# Allegro board TB67S109_V10_220218.brd
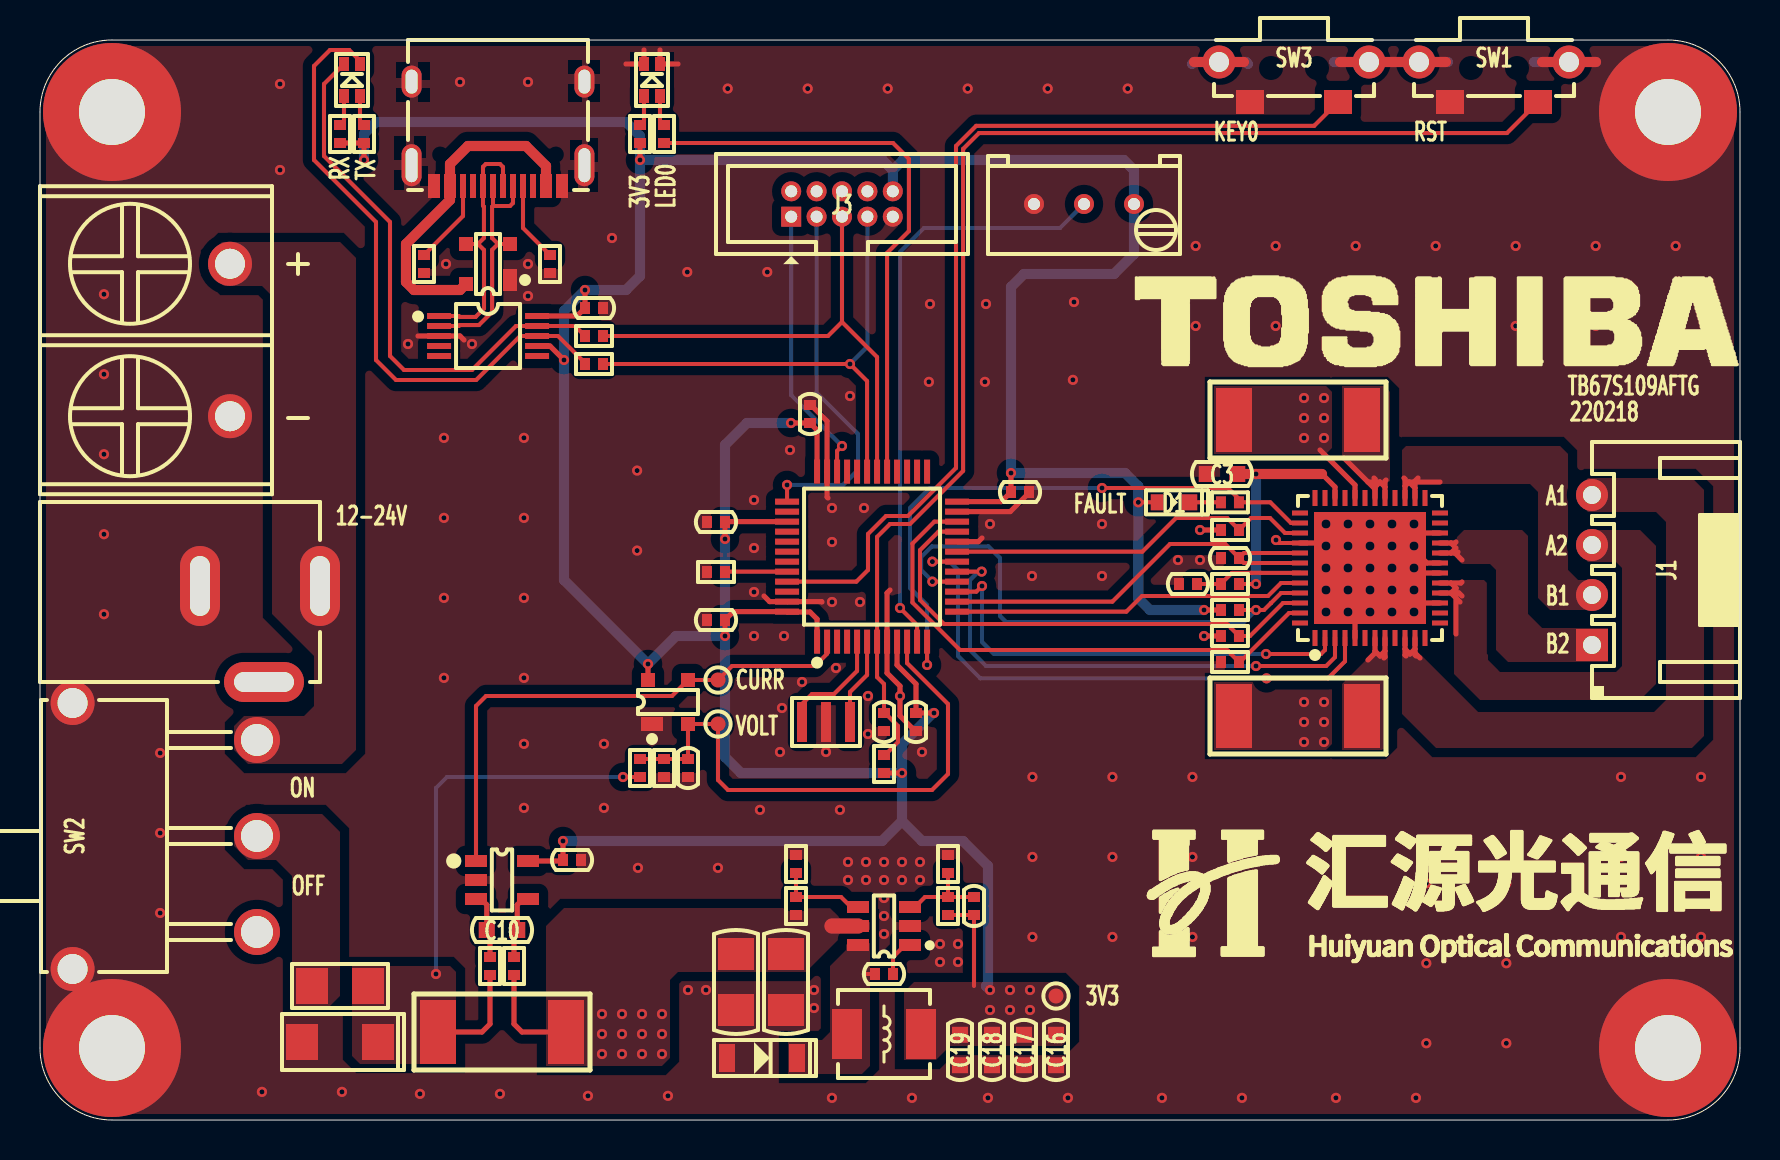
[diagram p0: board, top side]
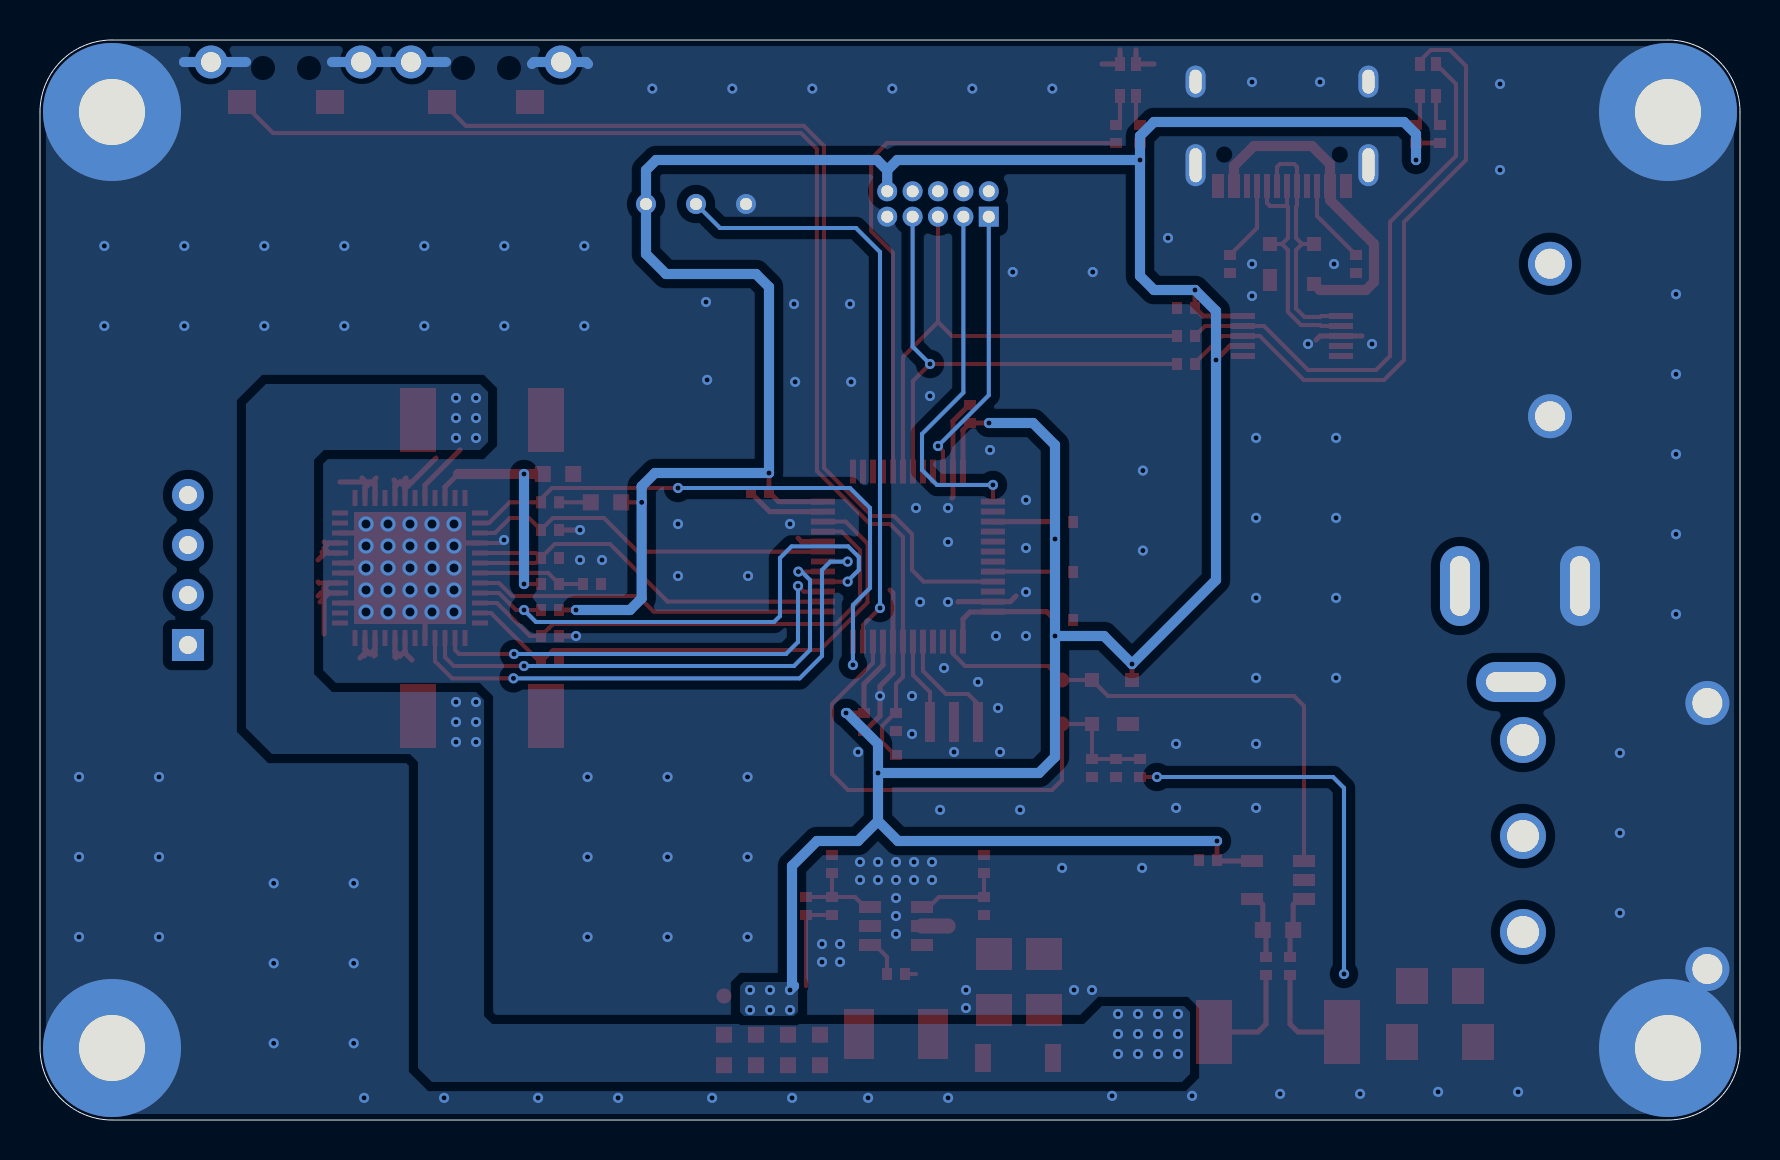
[diagram p1: board, bottom side, seen from below]

Outline 85 x 54 mm; copper layers: TOP, BOTTOM. Coordinates in mm from the lower left corner of the outline.
Outline path: 0,50.4 arc(1.05,52.95) 3.6,54 81.4,54 arc(83.95,52.95) 85,50.4 85,3.6 arc(83.95,1.05) 81.4,0 3.6,0 arc(1.05,1.05) 0,3.6 0,50.4

## Design rules (mm)
constraint set DEFAULT: min track width 0.203, pair gap 0.203
net group USB_D: nets USB_DM USB_DP

## Placement (name value [footprint] x y rotation side)
C1  1nF_50V  [C0402]  59.5 28.1 0 top
C2  1nF_50V  [C0402]  57.4 26.8 180 top
C3  10uF_10V  [C0603]  59.1 32.3 0 top
C4  100nF_50V  [C0402]  49 31.4 0 top
C5  100nF_50V  [C0402]  33.8 29.9 180 top
C6  100nF_50V  [C0402]  38.5 35.3 90 top
C7  100nF_50V  [C0402]  33.8 25 180 top
C8  100nF_50V  [C0402]  42.2 19.9 270 top
C9  100nF_50V  [C0402]  26.6 13 180 top
C10  10uF_10V  [C0603]  23.1 9.5 0 top
C11  100nF_50V  [C0402]  32.4 17.6 270 top
C12  100nF_50V  [C0402]  42.2 7.3 180 top
C13  10uF_50V  [C1206]  37.3 6.9 270 top
C14  10uF_50V  [C1206]  34.8 6.9 270 top
C15  30pF_50V  [C0402]  46.7 10.7 270 top
C16  10uF_10V  [C0603]  50.8 3.5 270 top
C17  10uF_10V  [C0603]  49.2 3.5 270 top
C18  10uF_10V  [C0603]  47.6 3.5 270 top
C19  10uF_10V  [C0603]  46 3.5 270 top
C20  100nF_50V  [C0402]  27.7 40.6 180 top
C21  100nF_50V  [C0402]  43.8 19.9 270 top
D1  LED_GREEN  [LED0603]  56.7 30.88 0 top
D2  -  [XL-2012SURUGC]  30.6 52 270 top
D3  SS56F  [SMAF]  15 3.9 0 top
D4  -  [XL-2012SURUGC]  15.6 52 270 top
D5  MBR140  [SOD123]  36.1 3.1 180 top
DC1  -  [DC005]  8 26.7 0 top
F1  0469005.WR  [FUSE1206]  15 6.7 0 top
J1  -  [HX25035-4WA]  77.6 27.5 90 top
J2  KF7.62-2P  [KF7R62-2P]  9.5 39 90 top
J3  -  [DC3-10P-Z]  40.1 45.8 180 top
L1  FXL0420-100-M  [L0420]  42.2 4.3 0 top
MH1  HOLD_M3/NI  [HOLD6R90X3R40]  3.6 3.6 0 top
MH2  HOLD_M3/NI  [HOLD6R90X3R40]  81.4 3.6 0 top
MH3  HOLD_M3/NI  [HOLD6R90X3R40]  81.4 50.4 0 top
MH4  HOLD_M3/NI  [HOLD6R90X3R40]  3.6 50.4 0 top
NOREF  -  []  0 0 0 top
NOREF#2  -  []  0 0 90 top
NOREF#3  -  []  0 0 0 top
NOREF#4  -  []  0 0 0 top
NOREF#5  -  []  0 0 90 top
NOREF#6  -  []  0 0 90 top
R1  10K  [R0402]  33.8 27.4 0 top
R2  10K  [R0402]  59.5 29.5 0 top
R3  10K  [R0402]  59.5 24.2 0 top
R4  10K  [R0402]  59.5 22.9 0 top
R5  10K  [R0402]  59.5 25.5 180 top
R6  10K  [R0402]  59.5 30.88 0 top
R7  1K  [R0402]  59.5 26.8 0 top
R8  0R25  [R2512]  62.9 20.2 0 top
R9  0R25  [R2512]  62.9 35 0 top
R10  10K  [R0402]  42.2 17.8 90 top
R11  4.7K  [R0402]  31.2 49.3 90 top
R12  10R  [R0402]  22.5 7.7 270 top
R13  10R  [R0402]  23.7 7.7 270 top
R14  4.7K  [R0402]  30 49.3 90 top
R15  0R5  [R2512]  23.1 4.4 180 top
R16  100K  [R0402]  30 17.6 270 top
R17  10K  [R0402]  31.2 17.6 90 top
R18  10K  [R0402]  37.8 12.8 90 top
R19  100K  [R0402]  37.8 10.7 90 top
R20  30K  [R0402]  45.4 12.8 270 top
R21  4.7K  [R0402]  16.2 49.3 270 top
R22  4.7K  [R0402]  15 49.3 270 top
R23  4.7K  [R0402]  25.5 42.8 90 top
R24  100K  [R0402]  45.4 10.7 270 top
R25  1K  [R0402]  27.7 39.2 180 top
R26  4.7K  [R0402]  19.2 42.8 270 top
R27  1K  [R0402]  27.7 37.8 180 top
RP1  3296W-1-503  [3296W]  52.2 45.8 0 top
SW1  -  [K2-1112SW-A4SW-04]  72.7 52.6 0 top
SW2  -  [SS-12D11G3R]  3.2 14.2 90 top
SW3  -  [K2-1112SW-A4SW-04]  62.7 52.6 0 top
TP1  TP/NI  [TP-0R75]  33.9 22 0 top
TP2  TP/NI  [TP-0R75]  33.9 19.8 0 top
TP3  TP/NI  [TP-0R75]  50.8 6.2 0 top
U1  STM32F103CBT6  [LQFP48-7X7X0R5]  41.6 28.17 0 top
U2  TB67S109AFTG  [QFN48-7X7X0R5-5R6X5R6]  66.5 27.6 0 top
U3  INA193AIDBV  [SOT23-5]  23.1 12 270 top
U4  PRTR5V0U2X  [SOT143B]  31.4 20.9 0 top
U5  BL9342  [SOT23-6]  42.2 9.7 90 top
U6  CH340E  [MSOP10]  22.4 39.2 270 top
U7  PRTR5V0U2X  [SOT143B]  22.4 42.8 90 top
USB1  -  [TYPE-C-31-M-12]  22.9 46.7 180 top
X1  CSTCE8M00G15C99-R0  [X-3P-3R2X1R3-SMD]  39.3 19.9 0 top

## Library data of the parts
C1-C7 C9 C20 C21 = CAP NP_2
C8 = CAP NP
C10-C19 = CAP NP_3
D1 = LED_4
D2 D4 = XL-2012SURUGC
D3 = DIODE13_9
D5 = BZX84C15/SOT_2
DC1 = DC005
F1 = FUSE
J1 = CONN RCPT 4
J2 = CONN RCPT 2
J3 = DC3-10P-Z-L
L1 = INDUCTOR_0
MH1-MH4 = Hold_1
R1-R27 = R_Generic
RP1 = 3296W-1-503
SW1 SW3 = SWITCH-SPST-4P
SW2 = SWITCH_3P
TP1-TP3 = TestPoint
U1 = STM32F103C8T6
U2 = TB67S109AFTG
U3 = 74AHC1G08_1
U4 U7 = PRTR5V0U2X
U5 = BL9342
U6 = CH340E
USB1 = TYPE-C_0
X1 = XTAL_5032_0

## Footprints (pads in the part's own frame, mm; a bottom-side part is the same pattern mirrored in y, then rotated)
3296W
  round 1 hole 0.6: 1(-2.5,0) 2(0,0) 3(2.5,0)
C0402
  rect 0.5x0.6 smd: 1(-0.45,0) 2(0.45,0)
C0603
  rect 0.8x0.8 smd: 1(-0.762,0) 2(0.762,0)
C1206
  rect 1.6x1.8 smd: 1(-1.4,0) 2(1.4,0)
DC3-10P-Z
  rect 1x1 hole 0.6: 1(2.54,0.635)
  round 1 hole 0.6: 2(2.54,-0.635) 3(1.27,0.635) 4(1.27,-0.635) 5(0,0.635) 6(0,-0.635) 7(-1.27,0.635) 8(-1.27,-0.635) 9(-2.54,0.635) 10(-2.54,-0.635)
DC005
  oval 2x4 hole 1x3: 1(6,0) 2(0,0)
  oval 4x2 hole 3x1: 3(3.2,-4.8)
FUSE1206
  rect 1.6x1.8 smd: 1(-1.4,0) 2(1.4,0)
HOLD6R90X3R40
  round 6.9 hole 3.3: 1(0,0)
HX25035-4WA
  rect 1.6x1.6 hole 0.9: 1(-3.75,0)
  round 1.6 hole 0.9: 2(-1.25,0) 3(1.25,0) 4(3.75,0)
K2-1112SW-A4SW-04
  round 1.65 hole 1: 1(-3.75,0.3) 4(3.75,0.3)
  rect 1.4x1.2 smd: 2(-2.2,-1.7) 3(2.2,-1.7)
KF7R62-2P
  round 2.2 hole 1.5: 1(-3.81,0) 2(3.81,0)
L0420
  rect 1.5x2.5 smd: 1(-1.85,0) 2(1.85,0)
LED0603
  rect 0.8x0.8 smd: 1(-0.762,0) 2(0.762,0)
LQFP48-7X7X0R5
  rect 0.3x1.2 smd: 1(-2.75,-4.25) 2(-2.25,-4.25) 3(-1.75,-4.25) 4(-1.25,-4.25) 5(-0.75,-4.25) 6(-0.25,-4.25) 7(0.25,-4.25) 8(0.75,-4.25) 9(1.25,-4.25) 10(1.75,-4.25) 11(2.25,-4.25) 12(2.75,-4.25) 25(2.75,4.25) 26(2.25,4.25) 27(1.75,4.25) 28(1.25,4.25) 29(0.75,4.25) 30(0.25,4.25) 31(-0.25,4.25) 32(-0.75,4.25) 33(-1.25,4.25) 34(-1.75,4.25) 35(-2.25,4.25) 36(-2.75,4.25)
  rect 1.2x0.3 smd: 13(4.25,-2.75) 14(4.25,-2.25) 15(4.25,-1.75) 16(4.25,-1.25) 17(4.25,-0.75) 18(4.25,-0.25) 19(4.25,0.25) 20(4.25,0.75) 21(4.25,1.25) 22(4.25,1.75) 23(4.25,2.25) 24(4.25,2.75) 37(-4.25,2.75) 38(-4.25,2.25) 39(-4.25,1.75) 40(-4.25,1.25) 41(-4.25,0.75) 42(-4.25,0.25) 43(-4.25,-0.25) 44(-4.25,-0.75) 45(-4.25,-1.25) 46(-4.25,-1.75) 47(-4.25,-2.25) 48(-4.25,-2.75)
MSOP10
  rect 0.3x1.2 smd: 1(-1,-2.45) 2(-0.5,-2.45) 3(0,-2.45) 4(0.5,-2.45) 5(1,-2.45) 6(1,2.45) 7(0.5,2.45) 8(0,2.45) 9(-0.5,2.45) 10(-1,2.45)
QFN48-7X7X0R5-5R6X5R6
  rect 0.25x0.8 smd: 1(-2.75,-3.5) 2(-2.25,-3.5) 3(-1.75,-3.5) 4(-1.25,-3.5) 5(-0.75,-3.5) 6(-0.25,-3.5) 7(0.25,-3.5) 8(0.75,-3.5) 9(1.25,-3.5) 10(1.75,-3.5) 11(2.25,-3.5) 12(2.75,-3.5) 25(2.75,3.5) 26(2.25,3.5) 27(1.75,3.5) 28(1.25,3.5) 29(0.75,3.5) 30(0.25,3.5) 31(-0.25,3.5) 32(-0.75,3.5) 33(-1.25,3.5) 34(-1.75,3.5) 35(-2.25,3.5) 36(-2.75,3.5)
  rect 0.8x0.25 smd: 13(3.5,-2.75) 14(3.5,-2.25) 15(3.5,-1.75) 16(3.5,-1.25) 17(3.5,-0.75) 18(3.5,-0.25) 19(3.5,0.25) 20(3.5,0.75) 21(3.5,1.25) 22(3.5,1.75) 23(3.5,2.25) 24(3.5,2.75) 37(-3.5,2.75) 38(-3.5,2.25) 39(-3.5,1.75) 40(-3.5,1.25) 41(-3.5,0.75) 42(-3.5,0.25) 43(-3.5,-0.25) 44(-3.5,-0.75) 45(-3.5,-1.25) 46(-3.5,-1.75) 47(-3.5,-2.25) 48(-3.5,-2.75)
  rect 5.6x5.6 smd: 49(0,0)
R0402
  rect 0.5x0.6 smd: 1(-0.45,0) 2(0.45,0)
R2512
  rect 1.8x3.2 smd: 1(-3.2,0) 2(3.2,0)
SMAF
  rect 1.6x1.8 smd: 1(-1.9,0) 2(1.9,0)
SOD123
  rect 0.8x1.4 smd: 1(1.75,0) 2(-1.75,0)
SOT23-5
  rect 0.6x1.1 smd: 1(-0.95,-1.3) 2(0,-1.3) 3(0.95,-1.3) 4(0.95,1.3) 5(-0.95,1.3)
SOT23-6
  rect 0.6x1.1 smd: 1(-0.95,-1.3) 2(0,-1.3) 3(0.95,-1.3) 4(0.95,1.3) 5(0,1.3) 6(-0.95,1.3)
SOT143B
  rect 1.1x0.7 smd: 1(-0.8,-1.1)
  rect 0.7x0.7 smd: 2(1,-1.1) 3(1,1.1) 4(-1,1.1)
SS-12D11G3R
  round 2.2 hole 1.5: 1(-6.65,1.57) 5(6.65,1.57)
  round 2.3 hole 1.6: 2(-4.8,-7.65) 3(0,-7.65) 4(4.8,-7.65)
TP-0R75
  round 0.75 smd: 1(0,0)
TYPE-C-31-M-12
  rect 0.6x1.2 smd: 1(-3.2,0) 2(-2.4,0) 11(2.4,0) 12(3.2,0)
  rect 0.3x1.2 smd: 3(-1.75,0) 4(-1.25,0) 5(-0.75,0) 6(-0.25,0) 7(0.25,0) 8(0.75,0) 9(1.25,0) 10(1.75,0)
  oval 1x2.1 hole 0.6x1.7: 13(-4.32,-1.04) 14(4.32,-1.04)
  oval 1x1.6 hole 0.6x1.2: 15(-4.32,-5.22) 16(4.32,-5.22)
X-3P-3R2X1R3-SMD
  rect 0.5x2 smd: 1(-1.2,0) 2(0,0) 3(1.2,0)
XL-2012SURUGC
  rect 0.7x0.5 smd: 1(-0.8,0.4) 2(0.8,0.4) 3(-0.8,-0.4) 4(0.8,-0.4)

## Nets
GND: C1.1 C2.2 C3.1 C4.2 C5.2 C6.2 C7.2 C8.2 C9.1 C11.2 C13.2 C14.2 C16.2 C17.2 C18.2 C19.2 C20.1 C21.2 D2.1(R-) D2.3 D3.1 D5.1 DC1.2 J2.1 J3.9 MH1.1 MH2.1 MH3.1 MH4.1 R1.1 R2.1 R3.1 R4.1 R17.1 R18.2 R20.1 R23.1 R26.2 RP1.1 SW1.1 SW1.2 SW1.4 SW2.1 SW2.5 SW3.1 SW3.2 SW3.4 U1.8 U1.20 U1.23 U1.35 U1.47(VSS_3) U2.5 U2.15 U2.18 U2.19 U2.22 U2.40 U2.49 U3.2 U4.1 U5.2 U6.3 U7.1 USB1.1 USB1.12 USB1.13 USB1.14 USB1.15 USB1.16 X1.2
VCC_3.3V: C4.1 C5.1 C6.1 C7.1 C9.2 C15.2 C16.1 C17.1 C18.1 C19.1 C20.2 C21.1 D1.1 J3.10 L1.2 R5.2 R10.1 R14.1 R21.2 R22.2 R24.2 RP1.3 TP3.1 U1.1 U1.9 U1.24 U1.36 U1.39 U1.48 U3.5 U4.4 U6.7(VCC) U6.10
VCC_5V: U7.4 USB1.2 USB1.11(VBUS2)
VCC_5V_OUT: C3.2 R7.2 U2.34
VCC_24V: C13.1 C14.1 R8.1 R9.1 R13.2 R15.1 R19.1 U2.32 U5.5(VIN)
VCC_24V_IN: DC1.1 J2.2 SW2.4
CH340E_RXD: D4.3 R25.2 U6.9
CH340E_TXD: D4.1(R-) R27.2 U6.8
H_AOUT1: J1.4 U2.10 U2.11
H_AOUT2: J1.3 U2.16 U2.17
H_BOUT1: J1.2 U2.26 U2.27
H_BOUT2: J1.1 U2.20 U2.21
OSC_IN: U1.5 X1.1
OSC_OUT: U1.6 X1.3
PA0/VOLT: C11.1 R16.1 R17.2 TP2.1 U1.10 U4.2
PA1/RPOT: RP1.2 U1.11
PA2/FAULT_L: R6.2 U1.12 U2.38
PA3/DIR: U1.13 U2.44
PA4/VREF: C1.2 U1.14 U2.41(VREFB) U2.42
PA5/CLK: U1.15 U2.2
PA6/MO: R5.1 U1.16 U2.45
PA7/ENABLE_H: U1.17 U2.3
PA8/LED0: R11.1 U1.29
PA9/USART1_TX: J3.5 R25.1 U1.30
PA10/USART1_RX: J3.7 R27.1 U1.31
PB0/RESET_L: U1.18 U2.4
PB1/DMODE0: R2.2 U1.19 U2.39
PB8/KEY0: SW3.3 U1.45
PB10/DMODE1: R3.2 U1.21 U2.46
PB11/DMODE2: R4.2 U1.22 U2.47
PC13/CURR: TP1.1 U1.2 U3.1 U4.3
STM_RST: C8.1 R10.2 SW1.3 U1.7
SWCLK: J3.3 U1.37
SWDIO: J3.1 U1.34
USB_DM: U6.2 U7.2 USB1.5 USB1.7
USB_DP: U6.1 U7.3 USB1.6 USB1.8
N17256471: R1.2 U1.44
N17256486: D2.4 R14.2
N17256488: D2.2 R11.2
N17256513: R26.1 USB1.10
N17256515: R23.2 USB1.4
N17269438: C2.1 R7.1 U2.43
N17269609: R8.2 U2.7 U2.8
N17269613: R9.2 U2.29 U2.30
N17274783: C10.1 R12.1 U3.3
N17274787: C10.2 R13.1 U3.4(VIN-)
N17274839: D3.2(ANODE_2) F1.2 R12.2 R15.2 R16.2
N17279585: D4.2 R21.1
N17279608: D4.4 R22.1
N17283216: R18.1 R19.2 U5.4
N17283254: C15.1 R20.2 R24.1 U5.3
N17283304: C12.2 D5.2(CATHODE) L1.1 U5.6
N17283308: C12.1 U5.1
N17284828: F1.1 SW2.3
N172692661: D1.2(CATHODE) R6.1

Pads without a net: DC1 3; J3 2 4 6 8; SW2 2; U1 3 4 25 26 27 28 32 33 38 40 41 42 43 46; U2 1 6 9 12 13 14 23 24 25 28 31 33 35 36 37 48; U6 4 5 6; USB1 3 9

## Via types
v1: diameter 0.508, hole 0.254, TOP to BOTTOM, 212 vias
v2: diameter 0.762, hole 0.457, TOP to BOTTOM, 25 vias

## Routing (per net, layer and track width the routed paths; a pad name or vN(x,y) marks a point on that pad's centre or on a via; arc(x,y) is an arc through that point)
GND: length 62.1
  TOP w0.203: v1(61.8,29) 61.95,28.85 U2.40
  TOP w0.254: v2(68.7,25.4) 69.15,25.85 U2.15 ; R2.1 v1(58,29.5) ; 30.2,53.5 D2.3 29.3,52.8 ; C21.2 43.75,19.45 43,20.2 v1(43,21.2) 43,21.7 42.35,22.35 U1.8 42.35,26.35 42.5,26.5 ; 39.1,25.9 39.08,25.92 U1.47 36.48,25.92 36.2,26.2 ; U1.20 46.92,28.92 47.1,29.1 ; U2.19 69.35,27.85 68.96,28.23 68.23,28.23 v2(67.6,27.6) ; 18.9,39.2 U6.3 21,39.2 21.2,39 ; v2(65.4,25.4) 65.75,25.05 U2.5 ; 31,53.5 D2.1 31.9,52.8 ; U2.18 68.95,27.35 v2(68.7,27.6) ; C4.2 49.45,31.35 48.51,30.42 U1.23 ; v2(68.7,29.8) 69.15,29.35 U2.22 ; v2(64.3,28.7) 64.15,28.85 U2.40 ; R3.1 v1(58.2,24.2) ; 39.4,31.1 39.35,31.15 U1.35 39.35,34.94 38.55,35.75 C6.2
  TOP w0.508: 57.7,52.9 SW3.1 60.2,52.9 ; 75.1,52.9 SW1.4 77.8,52.9 ; 65,52.9 SW3.4 SW1.1 70.3,52.9
  BOTTOM w0.508: 74.7,52.9 SW1.4 77.8,52.9 ; 57.6,52.8 57.7,52.9 SW3.1 60.3,52.9 60.4,52.8 ; 64.7,52.9 SW3.4 SW1.1 70.4,52.9
  vias: v1(3.2,41.29) v1(3.2,37.29) v1(3.2,33.29) v1(3.2,29.29) v1(3.2,25.29) v1(6.01,18.35) v1(6.01,14.35) v1(6.01,10.35) v1(11.1,1.41) v1(12,51.8) v1(12,47.5) v1(15.1,1.41) v1(18.4,38.8) v1(19,1.31) v1(20.2,34.11) v1(20.2,30.11) v1(20.2,26.11) v1(20.2,22.11) v1(20.3,42.8) v1(21,51.9) v1(21.6,38.8) v1(23,1.31) v1(24.2,34.11) v1(24.2,30.11) v1(24.2,26.11) v1(24.2,22.11) v1(24.2,18.81) v1(24.2,15.61) v1(24.4,51.9) v1(24.4,42.8) v1(24.4,41.2) v1(27.4,1.21) v1(28.2,18.81) v1(28.2,15.61) v1(28.6,44.1) v1(29.86,32.47) v1(29.86,28.47) v1(29.9,12.61) v1(31.4,1.21) v1(32.36,42.4) v1(32.4,6.5) v1(33.3,6.5) v1(33.9,12.61) v1(34.39,51.57) v1(35.7,31) v1(35.7,28.6) v1(35.7,26.4) v1(35.7,24.2) v1(36,15.51) v1(36.36,42.4) v1(37,18.4) v1(37.1,20.6) v1(37.2,24.2) v1(37.5,33.5) v1(38.1,21.9) v1(38.39,51.57) v1(38.7,6.5) v1(38.7,5.6) v1(39.3,18.4) v1(39.6,30.6) v1(39.6,28.9) v1(39.6,25.9) v1(39.6,1.11) v1(39.8,22.6) v1(40,15.51) v1(40.4,12.9) v1(40.4,12) v1(40.5,36.2) v1(41,25.9) v1(41.2,30.6) v1(41.3,12.9) v1(41.3,12) v1(41.4,21.2) v1(41.4,19.3) v1(42.2,12.9) v1(42.2,12) v1(42.2,11.1) v1(42.2,10.2) v1(42.2,9.3) v1(42.39,51.57) v1(43.1,12.9) v1(43.1,12) v1(43.6,1.11) v1(44,12.9) v1(44,12) v1(44.1,18.4) v1(44.44,36.91) v1(44.5,40.8) v1(45,8.8) v1(45,7.9) v1(45.9,8.8) v1(45.9,7.9) v1(46.39,51.57) v1(47.24,36.91) v1(47.3,40.8) v1(47.4,1.11) v1(47.5,29.8) v1(49.6,27.2) v1(49.62,17.15) v1(49.62,13.15) v1(49.62,9.15) v1(50.39,51.57) v1(51.4,1.11) v1(51.64,37.01) v1(51.7,40.9) v1(53.1,29.8) v1(53.1,27.2) v1(53.62,17.15) v1(53.62,13.15) v1(53.62,9.15) v1(54.39,51.57) v1(56.1,1.11) v1(56.9,28) v1(57.62,17.15) v1(57.62,13.15) v1(57.62,9.15) v1(57.78,43.7) v1(57.78,39.7) v1(58,28) v1(60.1,1.11) v1(61.78,43.7) v1(61.78,39.7) v1(64.8,1.11) v1(65.78,43.7) v1(65.78,39.7) v1(68.8,1.11) v1(69.32,11.84) v1(69.32,7.84) v1(69.32,3.84) v1(69.78,43.7) v1(69.78,39.7) v1(73.32,11.84) v1(73.32,7.84) v1(73.32,3.84) v1(73.78,43.7) v1(73.78,39.7) v1(77.78,43.7) v1(77.78,39.7) v1(79.05,17.15) v1(79.05,13.15) v1(79.05,9.15) v1(81.78,43.7) v1(81.78,39.7) v1(83.05,17.15) v1(83.05,13.15) v1(83.05,9.15) v2(64.3,29.8) v2(64.3,27.6) v2(64.3,26.5) v2(64.3,25.4) v2(65.4,29.8) v2(65.4,28.7) v2(65.4,27.6) v2(65.4,26.5) v2(66.5,29.8) v2(66.5,28.7) v2(66.5,27.6) v2(66.5,26.5) v2(66.5,25.4) v2(67.6,29.8) v2(67.6,28.7) v2(67.6,26.5) v2(67.6,25.4) v2(68.7,28.7) v2(68.7,26.5)
VCC_3.3V: length 219.2
  TOP w0.203: 46.7,6.7 C15.2 R24.2 ; D1.1 v1(54.92,30.88)
  TOP w0.254: U1.39 34.27,29.92 C5.1 v1(34.25,29.05) ; U6.10 26.85,40.2 C20.2 v1(27.25,41.5) ; R22.2 R21.2 v1(16.2,48) ; U4.4 v1(30.4,22.8) ; v1(34.25,24.2) C7.1 34.67,25.42 U1.48 37.37,25.4 38.5,25.4 38.85,25.05 U1.1 ; v1(44.7,20.35) C21.1 43.8,21.8 42.85,22.75 U1.9 ; U1.36 38.85,34.5 C6.1 v1(37.55,34.85) ; v1(48.55,32.35) C4.1 48.07,30.92 U1.24 ; R10.1 v1(43.1,17.35) ; R5.2 v1(58.2,25.5) ; U3.5 26.1,12.95 C9.2 v1(26.15,13.95) ; R14.1 v1(30,48) ; v1(26.2,38) 25.5,38.7 U6.7
  BOTTOM w0.508: v1(34.25,24.2) v1(34.25,29.05) 34.25,33.75 35.35,34.85 v1(37.55,34.85) ; v1(34.25,24.2) 34.25,18.15 35.05,17.35 v1(43.1,17.35) ; v1(34.25,24.2) 31.8,24.2 v1(30.4,22.8) 26.2,27 v1(26.2,38) 26.2,40.45 v1(27.25,41.5) 29.3,41.5 30,42.2 v1(30,48) ; v1(44.7,20.35) 44.65,20.35 43.1,18.8 v1(43.1,17.35) ; 42.64,47.49 42.64,46.44 ; 42.64,47.49 43.15,48 54.19,48 54.7,47.49 RP1.3 54.7,43.3 53.7,42.3 49.2,42.3 48.55,41.65 v1(48.55,32.35) 54.25,32.35 54.92,31.68 v1(54.92,30.88) 54.92,26.08 55.5,25.5 v1(58.2,25.5) ; 42.64,47.49 42.13,48 v1(30,48) ; 43.1,14.95 44.1,13.95 46.15,13.95 47.4,12.7 47.4,6.8 47.3,6.7 v1(47.5,6.5) ; 43.1,14.95 v1(43.1,17.35) ; 43.1,14.95 42.1,13.95 v1(26.15,13.95) ; v1(30,48) 30,49.2 29.3,49.9 16.8,49.9 16.2,49.3 v1(16.2,48)
  vias: v1(47.5,5.5) v1(48.5,6.5) v1(48.5,5.5) v1(49.5,6.5) v1(49.5,5.5)
VCC_5V: length 16.7
  TOP w0.508: USB1.2 25.3,47.7 24.3,48.7 21.4,48.7 20.5,47.8 USB1.11 20.5,46 18.3,43.8 18.3,41.9 18.7,41.5 21,41.5 U7.4
VCC_5V_OUT: length 12.1
  TOP w0.203: R7.2 v1(60.8,26.8)
  TOP w0.254: U2.34 64.75,31.65 64.1,32.3
  TOP w0.508: 64.1,32.3 v1(60.8,32.3) C3.2
  BOTTOM w0.508: v1(60.8,32.3) v1(60.8,26.8)
VCC_24V: length 9.6
  TOP w0.254: R13.2 23.7,4.8 24.1,4.4 R15.1 ; 64,33.5 65.75,31.75 U2.32
  TOP w0.762: U5.5 39.6,9.7
  vias: v1(28.1,5.3) v1(28.1,4.3) v1(28.1,3.3) v1(29.1,5.3) v1(29.1,4.3) v1(29.1,3.3) v1(30.1,5.3) v1(30.1,4.3) v1(30.1,3.3) v1(31.1,5.3) v1(31.1,4.3) v1(31.1,3.3) v1(63.2,36.1) v1(63.2,35.1) v1(63.2,34.1) v1(63.2,20.9) v1(63.2,19.9) v1(63.2,18.9) v1(64.2,36.1) v1(64.2,35.1) v1(64.2,34.1) v1(64.2,20.9) v1(64.2,19.9) v1(64.2,18.9)
CH340E_RXD: length 27.5
  TOP w0.203: R25.2 26.75,39.7 U6.9 23.8,39.7 21.6,37.5 18.2,37.5 17.5,38.2 17.5,44.9 14.2,48.2 14.2,51.8 D4.3
CH340E_TXD: length 31.4
  TOP w0.203: D4.1 16,52.96 15.46,53.5 14.5,53.5 13.7,52.7 13.7,48 16.8,44.9 16.8,38 17.8,37 21.81,37 24.01,39.2 U6.8 25.9,39.2 27.25,37.85 R27.2
H_AOUT1: length 2.9
  TOP w0.254: 68.75,23.35 68.75,23.25 68.8,23.2 ; 68.75,23.35 68.75,23.55 ; 68.75,23.35 69,23.1 ; U2.10 68.25,23.55 ; 68.25,23.55 68.5,23.3 68.75,23.55 ; 68.25,23.55 68.25,23.25 68.3,23.2 ; 68.75,23.55 U2.11
H_AOUT2: length 5.9
  TOP w0.254: U2.17 70.55,26.85 ; 70.55,26.85 71.05,26.85 71.1,26.9 ; 70.55,26.85 70.8,26.6 ; U2.16 70.55,26.35 ; 70.55,26.35 71,25.9 ; 70.55,26.35 70.8,26.6 ; 70.55,26.35 70.95,26.35 71.1,26.2 ; 70.8,26.6 70.8,24.3
H_BOUT1: length 4.3
  TOP w0.254: 68.45,31.9 68.75,31.6 ; 68.45,31.9 70,31.9 ; 68.45,31.9 68.25,31.7 ; 68.75,31.6 U2.26 ; 68.75,31.6 68.75,31.95 68.9,32.1 ; 68.25,31.7 68.25,32.05 68.2,32.1 ; 68.25,31.7 U2.27
H_BOUT2: length 2.8
  TOP w0.254: 71.1,28 70.75,28.35 ; 70.75,28.35 70.85,28.35 70.9,28.4 ; 70.75,28.35 70.55,28.35 ; 70.55,28.85 70.7,28.7 ; 70.55,28.85 U2.21 ; 70.55,28.85 70.75,28.85 70.8,28.9 ; U2.20 70.55,28.35 ; 70.55,28.35 70.8,28.6
OSC_IN: length 5.8
  TOP w0.203: X1.1 38.1,20.8 38.6,21.3 39.7,21.3 40.85,22.45 U1.5
OSC_OUT: length 4.4
  TOP w0.203: X1.3 40.5,21.4 41.35,22.25 U1.6
PA0/VOLT: length 28
  TOP w0.203: R16.1 R17.2 C11.1 U4.2 TP2.1 33.9,17 34.4,16.5 44.6,16.5 45.4,17.3 45.4,20.8 43.35,22.85 U1.10
PA1/RPOT: length 30
  TOP w0.203: v1(43,25.6) 43.85,24.75 U1.11
  BOTTOM w0.203: RP1.2 51,44.6 44.2,44.6 43,43.4 v1(43,25.6)
PA2/FAULT_L: length 30.1
  TOP w0.203: v1(53.1,31.6) 59.4,31.6 59.95,31.05 R6.2 61.52,30.88 62.55,29.85 U2.38 ; U1.12 v1(44.35,22.75)
  BOTTOM w0.203: v1(44.35,22.75) 44.35,25.75 43.5,26.6 43.5,30.6 44.5,31.6 v1(53.1,31.6)
PA3/DIR: length 17.7
  TOP w0.203: U1.13 54.32,25.42 55.1,26.2 61.4,26.2 62.05,26.85 U2.44
PA4/VREF: length 21.9
  TOP w0.203: U1.14 53.62,25.92 56.5,28.8 59.26,28.8 59.95,28.11 C1.2 ; U2.42 60.2,27.85 C1.2 ; C1.2 60.2,28.35 U2.41
PA5/CLK: length 22.2
  TOP w0.203: U2.2 64.25,23.5 64.05,23.3 v1(61.3,23.3) ; v1(47.1,26.7) 46.82,26.42 U1.15
  BOTTOM w0.203: v1(61.3,23.3) 47.7,23.3 47.1,23.9 v1(47.1,26.7)
PA6/MO: length 26.6
  TOP w0.203: U1.16 v1(44.62,26.92) ; U2.45 62.05,26.35 61.55,25.84 61.54,25.84 61.2,25.5 v1(60.8,25.5) R5.1
  BOTTOM w0.203: v1(60.8,25.5) 60.2,24.9 48.3,24.9 48,25.2 48,28.1 47.42,28.68 44.59,28.68 44.06,28.15 44.06,27.5 44.62,26.94 v1(44.62,26.92)
PA7/ENABLE_H: length 25.2
  TOP w0.203: U1.17 v1(47.08,27.42) ; U2.3 64.75,23.14 64.31,22.7 v1(60.8,22.7)
  BOTTOM w0.203: v1(60.8,22.7) 47.3,22.7 46.5,23.5 46.5,27 46.92,27.42 v1(47.08,27.42)
PA8/LED0: length 28.7
  TOP w0.203: U1.29 42.35,43.35 43.44,44.44 43.44,48.06 42.65,48.85 R11.1
PA9/USART1_TX: length 25.7
  TOP w0.203: J3.5 40.1,39.9 ; 40.1,39.9 41.85,38.15 U1.30 ; 40.1,39.9 39.4,39.2 R25.1
PA10/USART1_RX: length 25.8
  TOP w0.203: R27.1 v1(40.5,37.8) 41.35,36.95 U1.31
  BOTTOM w0.203: J3.7 41.37,38.67 v1(40.5,37.8)
PB0/RESET_L: length 28.3
  TOP w0.203: v1(61.33,22.08) 64.4,22.08 65.25,22.94 U2.4 ; U1.18 v1(44.62,27.92)
  BOTTOM w0.203: v1(44.62,27.92) 45.48,27.92 45.9,27.5 45.9,23.2 47.02,22.08 v1(61.33,22.08)
PB1/DMODE0: length 18.7
  TOP w0.203: U1.19 55.12,28.42 56.8,30.1 59.36,30.1 59.95,29.51 R2.2 60.55,30.1 61.5,30.1 62.25,29.35 U2.39
PB8/KEY0: length 48
  TOP w0.203: U1.45 40.82,26.92 41.4,27.5 41.4,29.3 42.3,30.2 43.4,30.2 45.8,32.6 45.8,48.7 46.81,49.71 63.71,49.71 SW3.3
PB10/DMODE1: length 25.2
  TOP w0.203: U1.21 44.93,29.42 44,28.49 44,26 45.2,24.8 59.35,24.8 59.39,24.75 59.4,24.75 59.55,24.61 59.55,24.6 R3.2 60.5,24.2 62.15,25.85 U2.46
PB11/DMODE2: length 27.3
  TOP w0.203: U2.47 62.45,25.35 60,22.9 R4.2 59.55,23.3 59.55,23.31 59.41,23.45 59.4,23.45 59.35,23.5 46,23.5 43.62,25.87 43.62,28.82 44.72,29.92 U1.22
PC13/CURR: length 27
  TOP w0.203: U3.1 21.8,20.7 22.3,21.2 31.6,21.2 U4.3 TP1.1 34.6,22.7 38.74,22.7 39.35,23.31 U1.2
STM_RST: length 63.2
  TOP w0.203: SW1.3 73.35,49.35 46.95,49.35 46.16,48.55 46.16,32.46 43.5,29.8 42.5,29.8 41.85,29.15 U1.7 41.85,22.15 42.2,21.8 C8.1 42.25,20.35 42.9,19.7 42.9,18.9 42.25,18.25 R10.2
SWCLK: length 18.2
  TOP w0.203: U1.37 v1(37.35,31.75)
  BOTTOM w0.203: J3.3 38.83,36.37 40.9,34.3 40.9,32.5 40.15,31.75 v1(37.35,31.75)
SWDIO: length 13.9
  TOP w0.203: v1(40.1,33.7) 39.85,33.45 U1.34
  BOTTOM w0.203: J3.1 37.56,36.24 v1(40.1,33.7)
USB_DM: length 12
  TOP w0.203: 22.65,45.72 USB1.7 ; 22.65,45.72 22.66,45.7 23.5,45.7 23.65,45.85 USB1.5 ; 22.65,45.72 22.6,45.67 22.6,44.1 22.9,43.8 ; U6.2 20.94,39.7 20.98,39.75 21.95,39.75 22.61,40.41 22.61,43.51 22.9,43.8 22.9,43.8 ; U7.2 22.9,43.8
USB_DP: length 12.5
  TOP w0.203: U7.3 21.9,43.8 ; 21.9,43.8 22.2,44.1 22.2,45.67 22.15,45.72 USB1.8 22.15,47.66 22.29,47.8 23,47.8 23.15,47.65 USB1.6 ; 21.9,43.8 21.9,43.8 22.2,43.5 22.2,40.57 21.78,40.15 20.98,40.15 20.94,40.2 U6.1
N17256471: length 3.1
  TOP w0.203: U1.44 34.27,27.42 R1.2
N17256486: length 1.5
  TOP w0.203: R14.2 30.2,49.95 D2.4
N17256488: length 1.5
  TOP w0.203: D2.2 31,49.95 R11.2
N17256513: length 4.3
  TOP w0.203: R26.1 21.15,45.2 USB1.10
N17256515: length 4
  TOP w0.203: R23.2 24.15,44.6 USB1.4
N17269438: length 5.4
  TOP w0.203: U2.43 63,27.35 61.04,27.35 61.03,27.36 60.57,27.36 60.56,27.35 59.59,27.35 59.05,26.81 R7.1 C2.1
N17269609: length 3
  TOP w0.254: 66.75,23.45 67,23.2 67.25,23.45 ; 66.75,23.45 66.75,23.35 66.4,23 ; 66.75,23.45 U2.7 ; 67.2,23.1 67.25,23.15 67.25,23.45 ; 67.25,23.45 U2.8
N17269613: length 5.4
  TOP w0.254: 66.75,31.65 66.75,32.05 66.7,32.1 ; 66.75,31.65 67,31.9 ; 66.75,31.65 66.75,31.55 ; U2.29 67.25,31.65 ; 67.25,31.65 67,31.9 ; 67.25,31.65 67.25,31.95 67.3,32 ; 67,31.9 66.4,31.9 ; 66.4,31.9 65.2,33.1 ; 66.4,31.9 66.75,31.55 ; U2.30 66.75,31.55
N17274783: length 3.3
  TOP w0.254: U3.3 22.05,11.05 22.34,10.76 C10.1 22.5,9.34 R12.1
N17274787: length 3.3
  TOP w0.254: R13.1 23.7,9.34 C10.2 23.86,10.76 24.15,11.05 U3.4
N17274839: length 24.9
  TOP w0.203: R16.2 v1(29.15,17.15)
  TOP w0.254: R15.2 22.1,4.4 22.5,4.8 R12.2
  BOTTOM w0.203: v1(29.15,17.15) 20.35,17.15 19.8,16.6 v1(19.8,7.3)
N17279585: length 1.5
  TOP w0.203: R21.1 16,49.95 D4.2
N17279608: length 1.5
  TOP w0.203: R22.1 15.2,49.95 D4.4
N17283216: length 4.5
  TOP w0.203: R18.1 R19.2 40.05,11.15 40.55,10.65 U5.4
N17283254: length 4.6
  TOP w0.203: R24.1 C15.1 ; R24.1 44.25,11.15 43.75,10.65 U5.3 ; R24.1 R20.2
N17283304: length 0.5
  TOP w0.203: C12.2 41.2,7.3
N17283308: length 1.9
  TOP w0.203: U5.1 43.25,8.75 42.65,8.15 C12.1
N172692661: length 1.6
  TOP w0.203: D1.2 R6.1

## Copper pours and planes (outline as drawn; the poured copper is in the pictures)
GND on TOP: 77.53,53.33 77.28,53.7 81.4,53.7 83.73,52.73 84.7,50.4 84.7,3.6 83.73,1.27 81.4,0.3 3.6,0.3 1.27,1.27 0.3,3.6 0.3,50.4 1.27,52.73 3.6,53.7 58.19,53.7 57.94,53.33 57.86,52.9 59,51.76 60.14,52.9 60.06,53.33 59.81,53.7 65.59,53.7 65.34,53.33 65.26,52.9 66.4,51.76 67.54,52.9 67.46,53.33 67.21,53.7 68.14,53.7 67.88,53.34 67.8,52.9 68.9,51.8 70,52.9 69.92,53.34 69.66,53.7 75.72,53.7 75.47,53.33 75.38,52.9 76.5,51.78 77.62,52.9 ; 26 cut-outs
GND on BOTTOM: 77.53,53.33 77.28,53.7 81.4,53.7 83.73,52.73 84.7,50.4 84.7,3.6 83.73,1.27 81.4,0.3 3.6,0.3 1.27,1.27 0.3,3.6 0.3,50.4 1.27,52.73 3.6,53.7 58.19,53.7 57.94,53.33 57.86,52.9 59,51.76 60.14,52.9 60.06,53.33 59.81,53.7 65.62,53.7 65.37,53.33 65.28,52.9 66.4,51.78 67.52,52.9 67.43,53.33 67.18,53.7 68.14,53.7 67.88,53.34 67.8,52.9 68.9,51.8 70,52.9 69.92,53.34 69.66,53.7 75.72,53.7 75.47,53.33 75.38,52.9 76.5,51.78 77.62,52.9
VCC_3.3V on TOP: 43.2,3 43.2,6.4 43.7,6.9 51.1,6.9 51.5,6.5 51.5,4.1 51.1,3.7 45.5,3.7 44.8,3
VCC_3.3V on BOTTOM: 47.3,5.2 49.8,5.2 50,5.4 50,6.7 49.8,6.9 47.3,6.9 47.1,6.7 47.1,5.4
VCC_24V on TOP: 25.3,2.7 31.1,2.7 31.5,3.1 31.5,7 31.9,7.4 38.3,7.4 40.2,9.3 41.5,9.3 41.5,10.1 40,10.1 39.5,10.6 26.2,10.6 25.3,9.7
VCC_24V on TOP: 58.7,21.9 64.3,21.9 64.6,21.6 64.6,18.8 64.3,18.5 58.7,18.5
VCC_24V on TOP: 58.7,36.7 64.3,36.7 64.6,36.4 64.6,33.6 64.3,33.3 58.7,33.3
VCC_24V on BOTTOM: 62.8,21 63.2,21.4 70.4,21.4 71.3,22.3 71.3,33 70.8,33.5 63,33.5 62.6,33.9 62.6,36.4 63,36.8 73.7,36.8 74.7,35.8 74.7,19.6 73.4,18.3 66.5,18.3 66.1,17.9 66.1,2.6 65.4,1.9 27.9,1.9 27.5,2.3 27.5,5.4 27.8,5.7 31.9,5.7 32.8,4.8 62.4,4.8 62.8,5.2
VCC_24V_IN on TOP: 9.1,43.9 15,43.9 15.8,43.1 15.8,18.5 15.1,17.8 10.4,17.8 9.7,18.5 9.7,19.7 10.2,20.2 13.2,20.2 13.7,20.7 13.7,23.2 11.6,25.3 11.6,41.2 11.1,41.7 9.2,41.7 8.5,42.4 8.5,43.3
H_AOUT1 on TOP: 68.1,23.4 68.1,20.3 69.8,18.6 82.6,18.6 83.2,19.2 83.2,31.5 82.6,32.1 77.4,32.1 76.9,31.6 76.9,30.9 77.4,30.4 80.8,30.4 81.3,29.9 81.3,21 80.7,20.4 71.9,20.4 68.9,23.4
H_AOUT2 on TOP: 70.7,27 72.2,27 72.4,26.8 72.4,23 73,22.4 78.8,22.4 79.1,22.7 79.1,27.6 78.8,27.9 77.4,27.9 76.9,28.4 76.9,29.1 77.3,29.5 80,29.5 80.8,28.7 80.8,21.8 80,21 72,21 70.7,22.3
H_BOUT1 on TOP: 68.1,31.8 68.1,33.5 68.3,33.7 76,33.7 76.4,33.3 76.4,27.5 76.9,27 77.9,27 78.4,26.5 78.4,26 77.9,25.5 75.5,25.5 74.9,26.1 74.9,31.4 74.5,31.8
H_BOUT2 on TOP: 75.1,24.6 78.4,24.6 78.4,22.9 73.4,22.9 72.8,23.5 72.8,27.5 72.5,27.8 71.1,27.8 70.7,28.2 70.7,29 71.2,29.5 74.1,29.5 74.4,29.2 74.4,25.3
N17269609 on TOP: 65.1,18.5 67.1,18.5 67.4,18.8 67.4,23.3 66.6,23.3 65.1,21.8
N17269613 on TOP: 65.1,36.7 67.2,36.7 67.5,36.4 67.5,31.8 66.3,31.8 65.1,33
N17274839 on TOP: 15.6,7.7 20.5,7.7 20.8,7.4 20.8,2.8 16,2.8 15.6,3.2
N17283304 on TOP: 37.4,4 39.1,4 39.5,4.4 39.5,7.7 40.3,8.5 40.3,9.1 41.5,9.1 41.5,2.7 41.1,2.3 37.4,2.3
N17284828 on TOP: 10.5,15.3 9.7,14.5 9.7,13.7 10.4,13 11.8,13 12.6,12.2 12.6,5.7 14.5,5.7 15,6.2 15,14.4 14.1,15.3

## Text on the board
Ref Des/Silkscreen Top: ON | OFF | 12-24V | CURR | VOLT | FAULT | 3V3 | KEY0 | RST | A1 | A2 | B1 | B2 | TB67S109AFTG | 220218 | RX | TX | LED0
DISPLAY_TOP: FIGURE | FINISHED_SIZE | 0.254 | 0.4572 | 0.6 | 0.9 | 1.0 | 1.5 | 1.6 | 3.3 | 1.2x0.6 | 1.7x0.6 | 3.0x1.0 | DRILL CHART: TOP to BOTTOM | ALL UNITS ARE IN MILLIMETERS | ROTATION | - | 90.000 | 0.000 | PLATED | QTY | 212 | 25 | 13 | 4 | 3 | 2 | 1 | 276 | TOTAL HOLES:
